# Altium PCB PCB1.pcbdoc
Units mil, origin at the board's own origin, x right, y up, seen from the top; angles counter-clockwise.
Board outline 2807.26 x 2661.64 mil, 2 copper layers (Top Layer, Bottom Layer); 13 components, 12 nets, 33 pads, 0 vias.
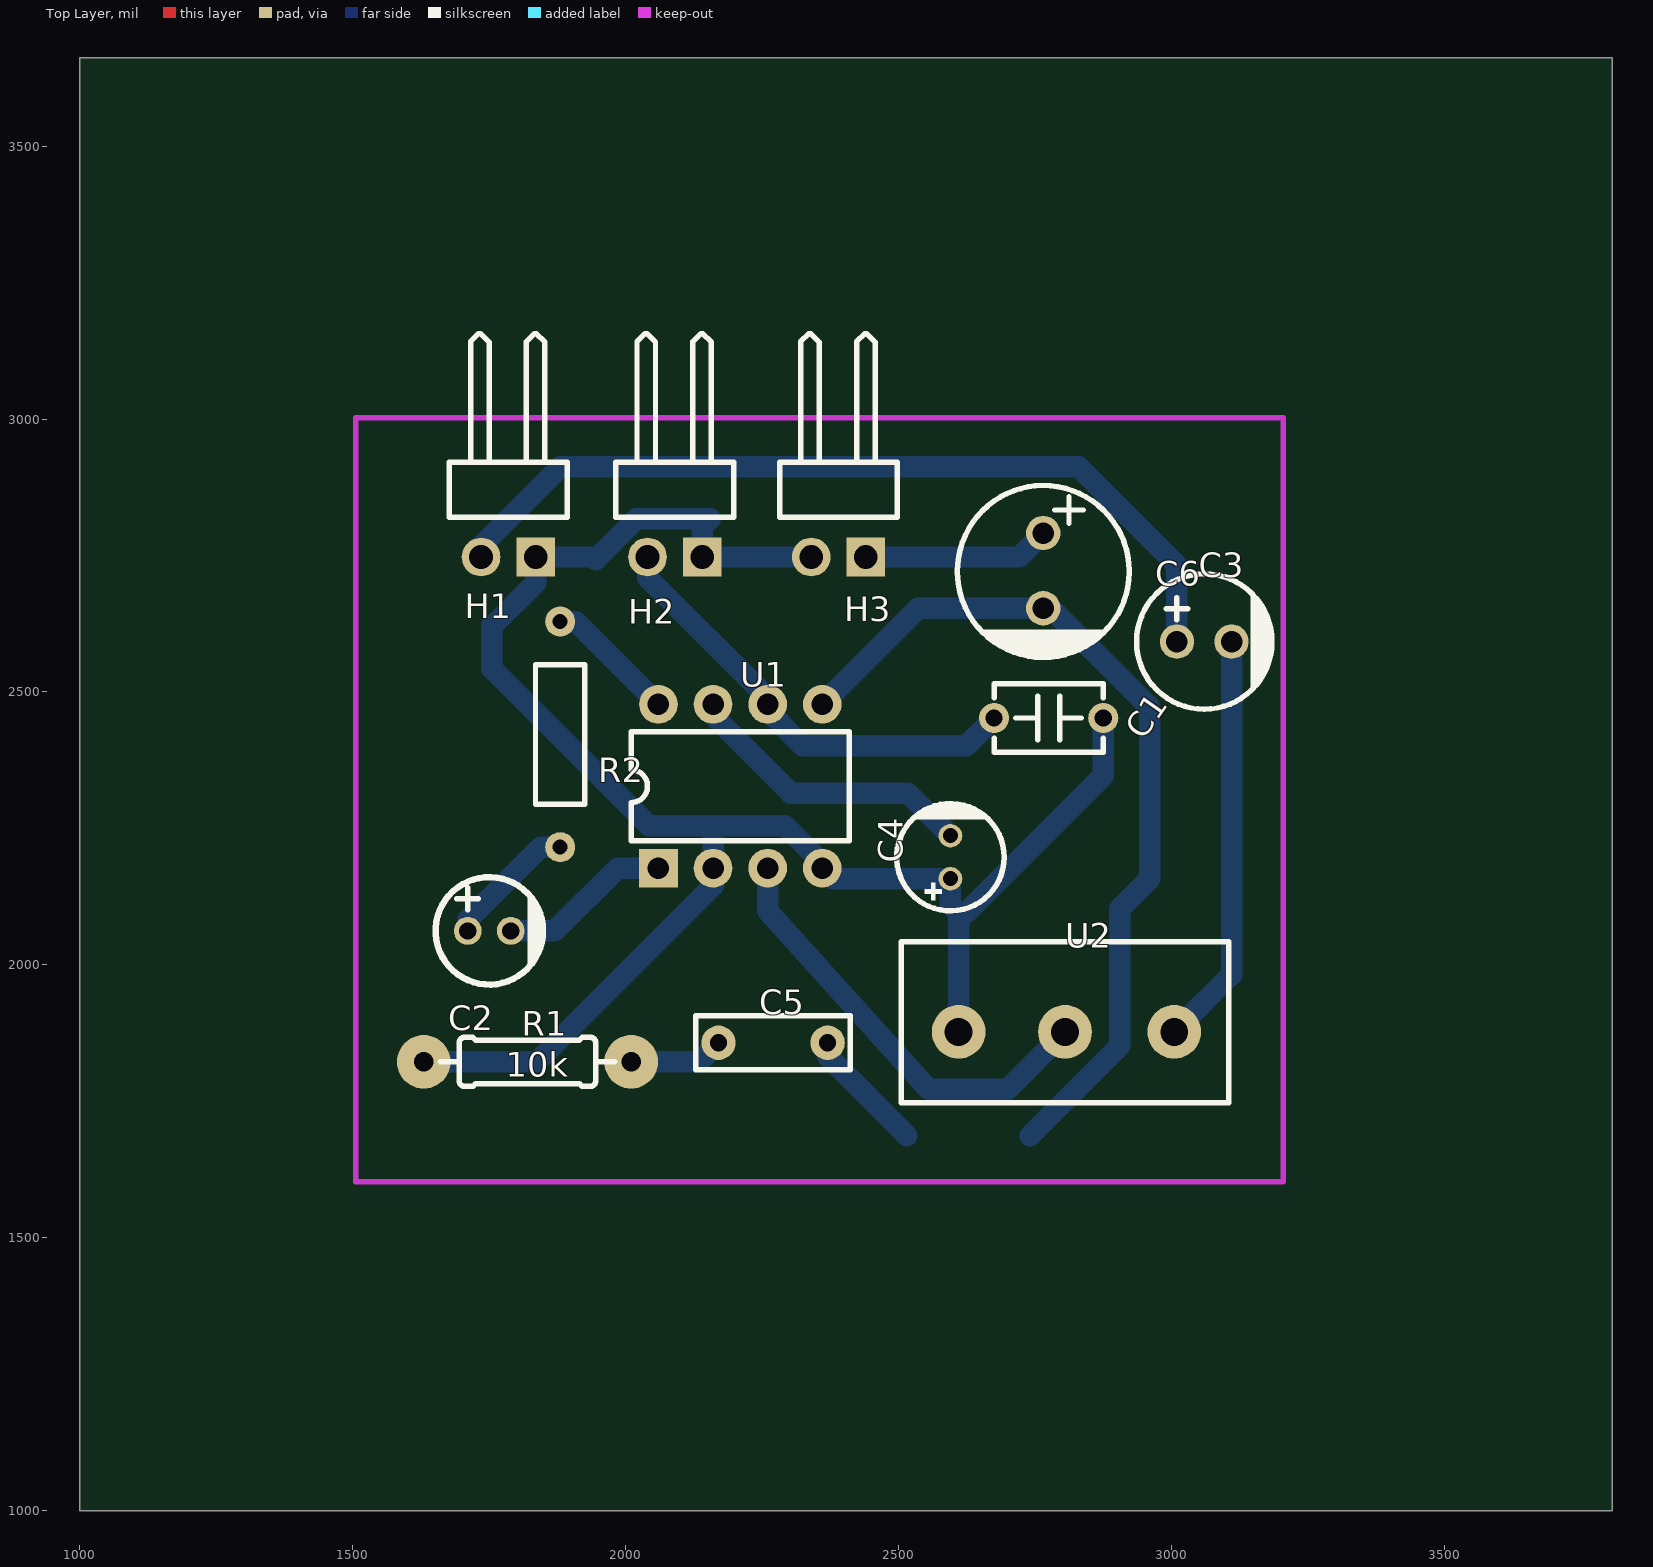
[diagram p0: Top Layer view]
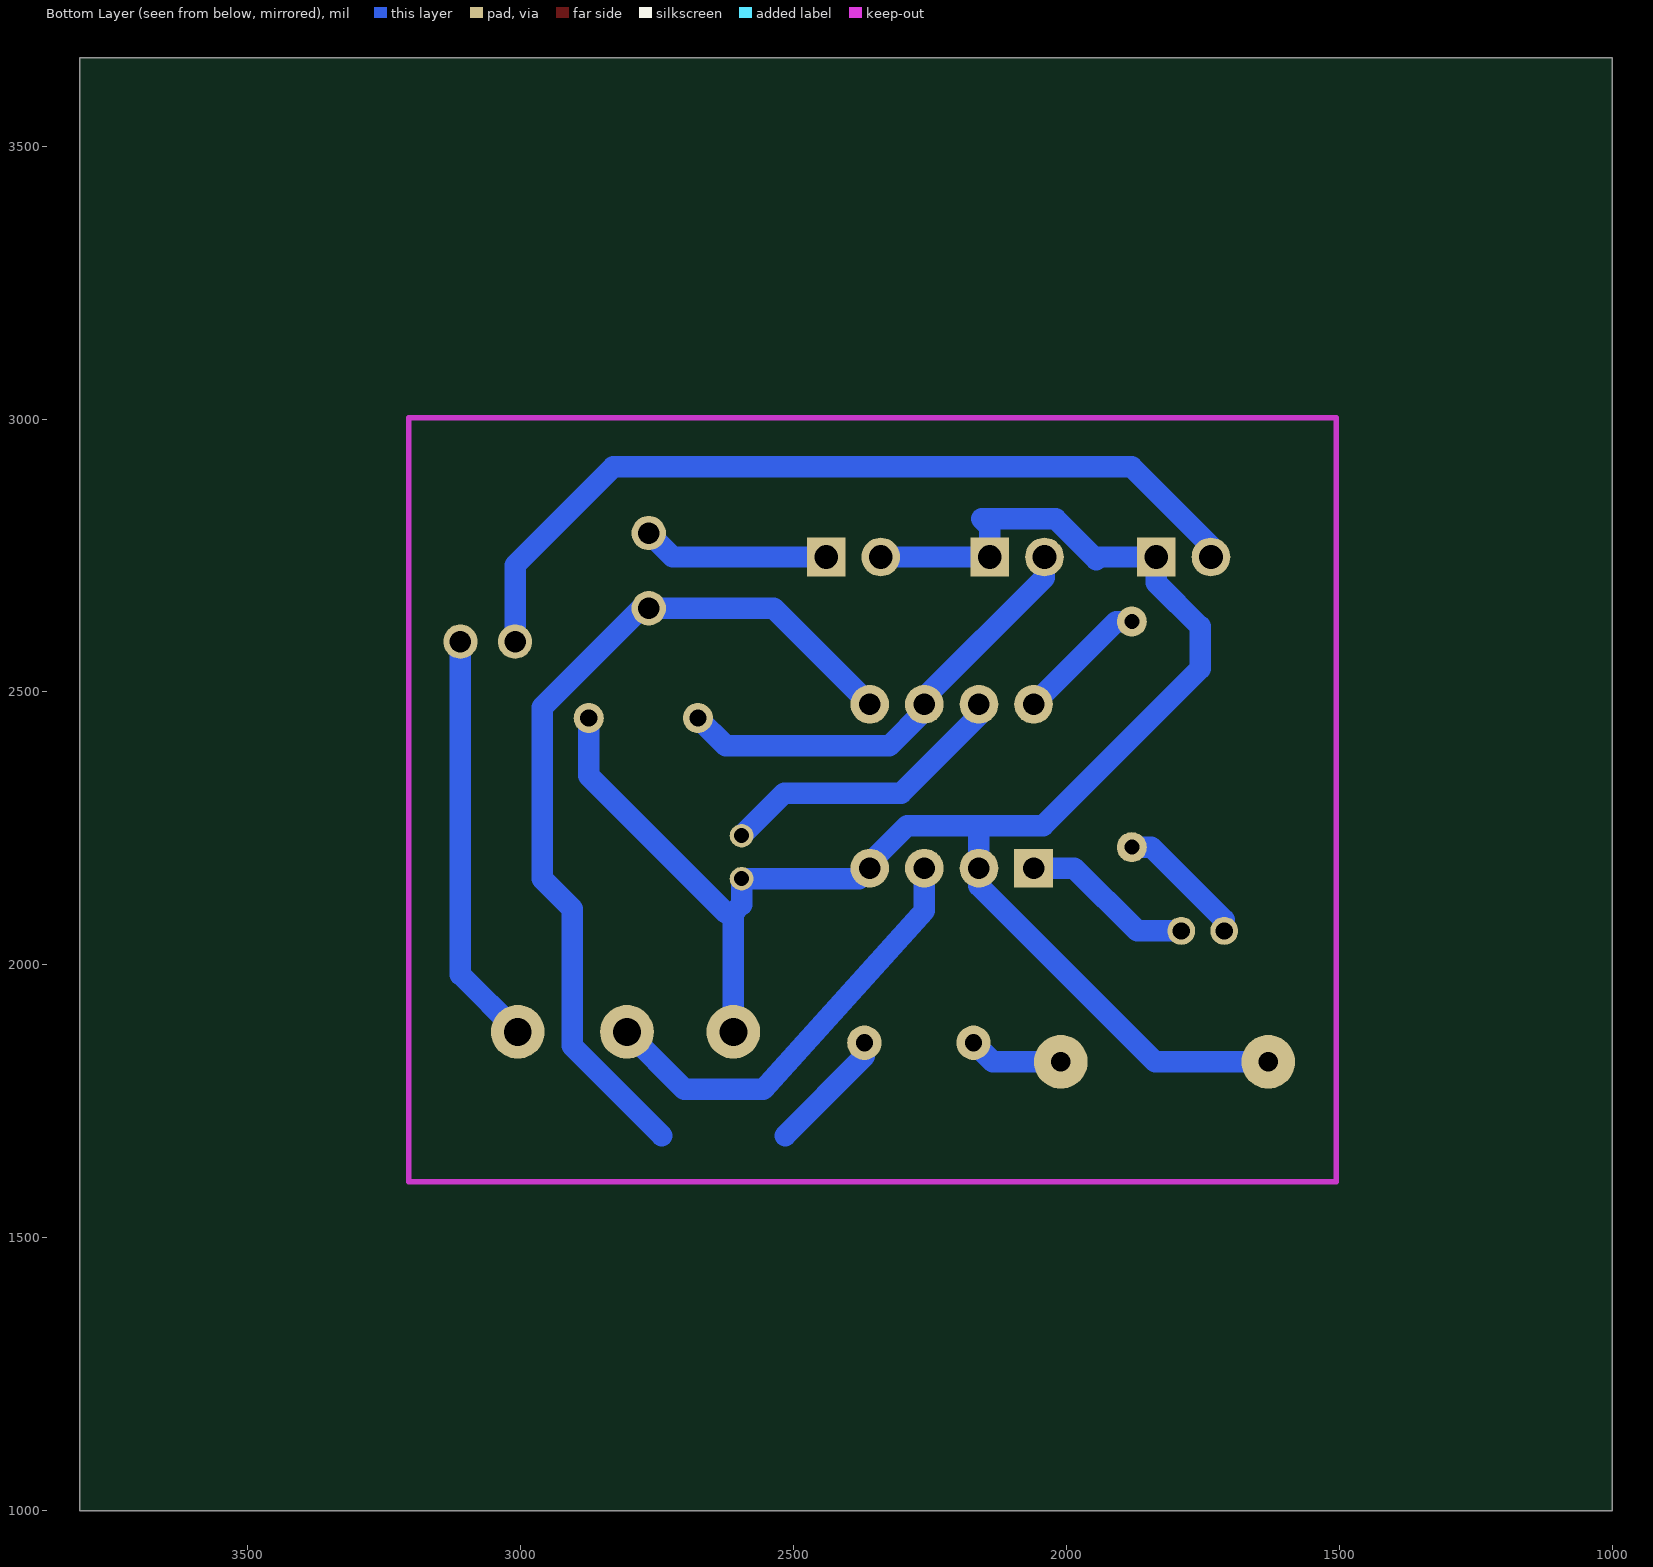
[diagram p1: Bottom Layer view, seen from below]

## Layer stack, top to bottom
Top Solder: solder mask 0.4, Solder Resist, Dk 3.5
Top Layer: signal copper 1.4
Dielectric1: dielectric 12.6, FR-4, Dk 4.8
Bottom Layer: signal copper 1.4
Bottom Solder: solder mask 0.4, Solder Resist, Dk 3.5

## Board outline
3807.26,1000 1000,1000 1000,3661.64 3807.26,3661.64

## Design rules (kind name [scope] priority, off if disabled: settings)
Clearance [All] p1: gap=10 ignorepadtopadclearanceinfootprint=FALSE
PolygonConnect [All] p1: connectstyle=Relief reliefconductorwidth=10 reliefentries=4 polygonreliefangle="90 Angle" airgapwidth=10
RoutingVias [All] p1: holewidth=28 width=50 viastyle="Through Hole" minholewidth=28 minwidth=50 maxholewidth=28 maxwidth=50
SolderMaskExpansion [All] p1: expansion=0 istentingtop=FALSE
Width [All] p1: maxlimit=10 minlimit=10 preferedwidth=10
30 further rules are at their usual default settings.

## Components (designator, comment, footprint, x,y, rotation, side; value= is the part's Value field where it differs from the comment)
C1 "100nF" CAP-TH_L5.0-W2.5-P5.08-D0.7 2775,2452.2 r0 top
C2 "10uF" CAP-TH_BD5.0-P2.00-D0.8-FD 1750,2062.2 r0 top
C3 "1uF" CAP-TH_BD6.3-P2.50-D1.0-FD 3060,2592.2 r0 top
C4 "10uF" CAP-TH_BD5.0-P2.00-D0.5-FD 2595,2197.2 r90 top
C5 "47nF" CAP-TH_L7.2-W2.5-P5.00-D0.5 2270,1857.19 r180 top
C6 "220uF" CAP-TH_BD8.0-P3.50-D0.6-FD_1 2765,2722.2 r270 top
H1 "ALIM 9V" HDR-TH_2P-P2.54-H-M-W10.4 1785,2747.2 r180 top
H2 "PZ254R-11-02P" HDR-TH_2P-P2.54-H-M-W10.4 2090,2747.2 r180 top
H3 "ALIM 9V" HDR-TH_2P-P2.54-H-M-W10.4 2390,2747.2 r180 top
R1 "RESISTOR 10K" "RESISTOR 10K" 1820,1822.19 r0 top
R2 "1.2K" RES-TH_BD2.3-L6.5-P10.50-D0.5 1880,2422.2 r90 top
U1 "LM386N" DIP-8_L9.7-W6.4-P2.54-LS7.6-BL 2210,2327.2 r0 top
U2 "POTENSIO MONO" "POTENSIO MONO" 2805,1877.19 r0 top

## Footprints (in the part's own frame and the unit in brackets; to place one, negate y for a bottom-side part, rotate by r counter-clockwise, add the part's x,y. Pads: shape width x height; smd on the part's side, far side on the other; paste and mask are expansions set on the pad)
CAP-TH_BD5.0-P2.00-D0.5-FD [mm]
  round 1.1 hole 0.7 paste-2539.97 mask+0.05: 1(-1,0) 2(1,0)
  silkscreen extent -2.5,-2.5 2.5,2.5
CAP-TH_BD5.0-P2.00-D0.8-FD [mm]
  round 1.3 hole 0.8 paste-2539.97 mask+0.051: 1(-1,0) 2(1,0)
  silkscreen extent -2.5,-2.5 2.5,2.5
CAP-TH_BD6.3-P2.50-D1.0-FD [mm]
  round 1.6 hole 1 paste-2539.97 mask+0.051: 1(-1.27,0) 2(1.27,0)
  silkscreen extent -3.15,-3.15 3.17,3.15
CAP-TH_BD8.0-P3.50-D0.6-FD_1 [mm]
  round 1.6 hole 1 paste-2539.97 mask+0.051: 1(-1.75,0) 2(1.75,0)
  silkscreen extent -3.96,-4 4.04,4
CAP-TH_L5.0-W2.5-P5.08-D0.7 [mm]
  round 1.4 hole 0.8 paste-2539.97 mask+0.051: 1(-2.54,0) 2(2.54,0)
  silkscreen extent -2.54,-1.59 2.54,1.59
CAP-TH_L7.2-W2.5-P5.00-D0.5 [mm]
  round 1.6 hole 0.8 paste-2539.97 mask+0.051: 1(-2.54,0) 2(2.54,0)
  silkscreen extent -3.6,-1.25 3.6,1.25
DIP-8_L9.7-W6.4-P2.54-LS7.6-BL [mm]
  rect 1.8x1.8 hole 1 paste-2539.97 mask+0.05: 1(-3.81,-3.81)
  round 1.8 hole 1 paste-2539.97 mask+0.05: 2(-1.27,-3.81) 3(1.27,-3.81) 4(3.81,-3.81) 5(3.81,3.81) 6(1.27,3.81) 7(-1.27,3.81) 8(-3.81,3.81)
  silkscreen extent -5.08,-2.53 5.08,2.53
HDR-TH_2P-P2.54-H-M-W10.4 [mm]
  rect 1.8x1.8 hole 1.1 paste-2539.97 mask+0.051: 1(-1.27,0)
  round 1.8 hole 1.1 paste-2539.97 mask+0.051: 2(1.27,0)
  silkscreen extent -2.74,-10.4 2.74,-1.86
"POTENSIO MONO" [mm]
  round 2.5 hole 1.3 paste-2539.97 mask+0.102: 1(-4.953,0) 2(0,0) 3(5.08,0)
  silkscreen extent -7.62,-3.3 7.62,4.19
RES-TH_BD2.3-L6.5-P10.50-D0.5 [mm]
  round 1.4 hole 0.7 paste-2539.97 mask+0.051: 1(-5.25,0) 2(5.25,0)
  silkscreen extent -3.25,-1.15 3.25,1.15
"RESISTOR 10K" [mm]
  round 2.5 hole 0.9 paste-2539.97 mask+0.102: 1(-4.826,0) 2(4.826,0)
  silkscreen extent -4.06,-1.14 4.06,1.14

## Nets (pads, with @x,y where several pads share a name; then routed paths per layer and width w, separated by ;. In a path a pad name is that pad's centre, name@x,y a point inside that pad or via, vN(x,y) a via of type N, cw(c..) or ccw(c..) an arc to the next point about the centre after c; other vN are vias at no path point)
C2_1: C2.1 R2.1 | length 244.6
  Bottom Layer w39.37: C2.1 1710.63,2082.18 1843.95,2215.51 R2.1
C5_2: C5.2 R1.2 | length 174.5
  Bottom Layer w39.37: R1.2 2135,1822.19 C5.2
C6_1: C6.1 H3.1 | length 343.2
  Bottom Layer w39.37: H3.1 2721.1,2747.2 C6.1
GND: C1.2 C4.1 H1.1 H2.1 H3.2 R1.1 U1.2 U1.4 U2.1 | length 3407.6
  Bottom Layer w39.37: R1.1 1837.44,1822.19 2160,2144.76 U1.2 2160,2255.24 ; 1944.8,2742.2 2019.7,2816.99 2155,2816.99 ; 1944.83,2742.2 1939.83,2747.2 H1.1 1835,2699.98 1755,2619.98 1755,2542.19 2041.95,2255.24 2160,2255.24 ; 2155,2817.2 2140,2802.02 H2.1 H3.2 ; U2.1 2610,2095.49 ; C1.2 2875,2346.62 2623.87,2095.49 2610,2095.49 ; 2160,2255.24 2291.41,2255.24 2360,2186.66 U1.4 2379.37,2157.82 C4.1 2595,2110.49 2610,2095.49
H1_2: C3.1 H1.2 | length 1569.6
  Bottom Layer w39.37: H1.2 1735,2767.2 1880,2912.2 2830,2912.2 3010,2732.2 C3.1
U1_1: C2.2 U1.1 | length 318.3
  Bottom Layer w39.37: C2.2 1870.17,2062.2 1985.17,2177.2 U1.1
U1_3: U1.3 U2.2 | length 812
  Bottom Layer w39.37: U1.3 2260,2098.8 2555,1772.19 2700,1772.19 U2.2
U1_5: C5.1 C6.2 U1.5 | length 1853.5
  Bottom Layer w39.37: U1.5 2536.1,2653.3 C6.2 2778.5,2653.3 2960,2471.8 2960,2157.59 2905,2102.59 2905,1851.3 2740.9,1687.19 ; C5.1 2370,1832.19 2515,1687.19
U1_6: C1.1 H2.2 U1.6 | length 835.5
  Bottom Layer w39.37: H2.2 2040,2709.28 2260,2489.28 U1.6 2260,2465.38 2324.05,2401.32 2624.13,2401.32 C1.1
U1_7: C4.2 U1.7 | length 546.4
  Bottom Layer w39.37: U1.7 2160,2457.2 2302.8,2314.39 2517.2,2314.39 C4.2
U1_8: R2.2 U1.8 | length 242.8
  Bottom Layer w39.37: R2.2 1908.31,2628.89 U1.8
U2_3: C3.2 U2.3 | length 758.5
  Bottom Layer w39.37: U2.3 3110,1982.19 C3.2

## Text inside footprints (layer, text, board x,y; h text height)
R1: Top Overlay "10k" at 1780,1795.25 h44.88